# Altium PCB Zotino.PCBDOC (part 9 of 10)
Units mm, origin at the board's own origin, x right, y up, seen from the top; angles counter-clockwise.
Board outline 160.1 x 100.1 mm, 4 copper layers (TopLayer, Internal Plane 2, Signal Layer 1, BottomLayer), stack 1.563 mm thick; 759 components, 378 nets, 2272 pads, 779 vias.
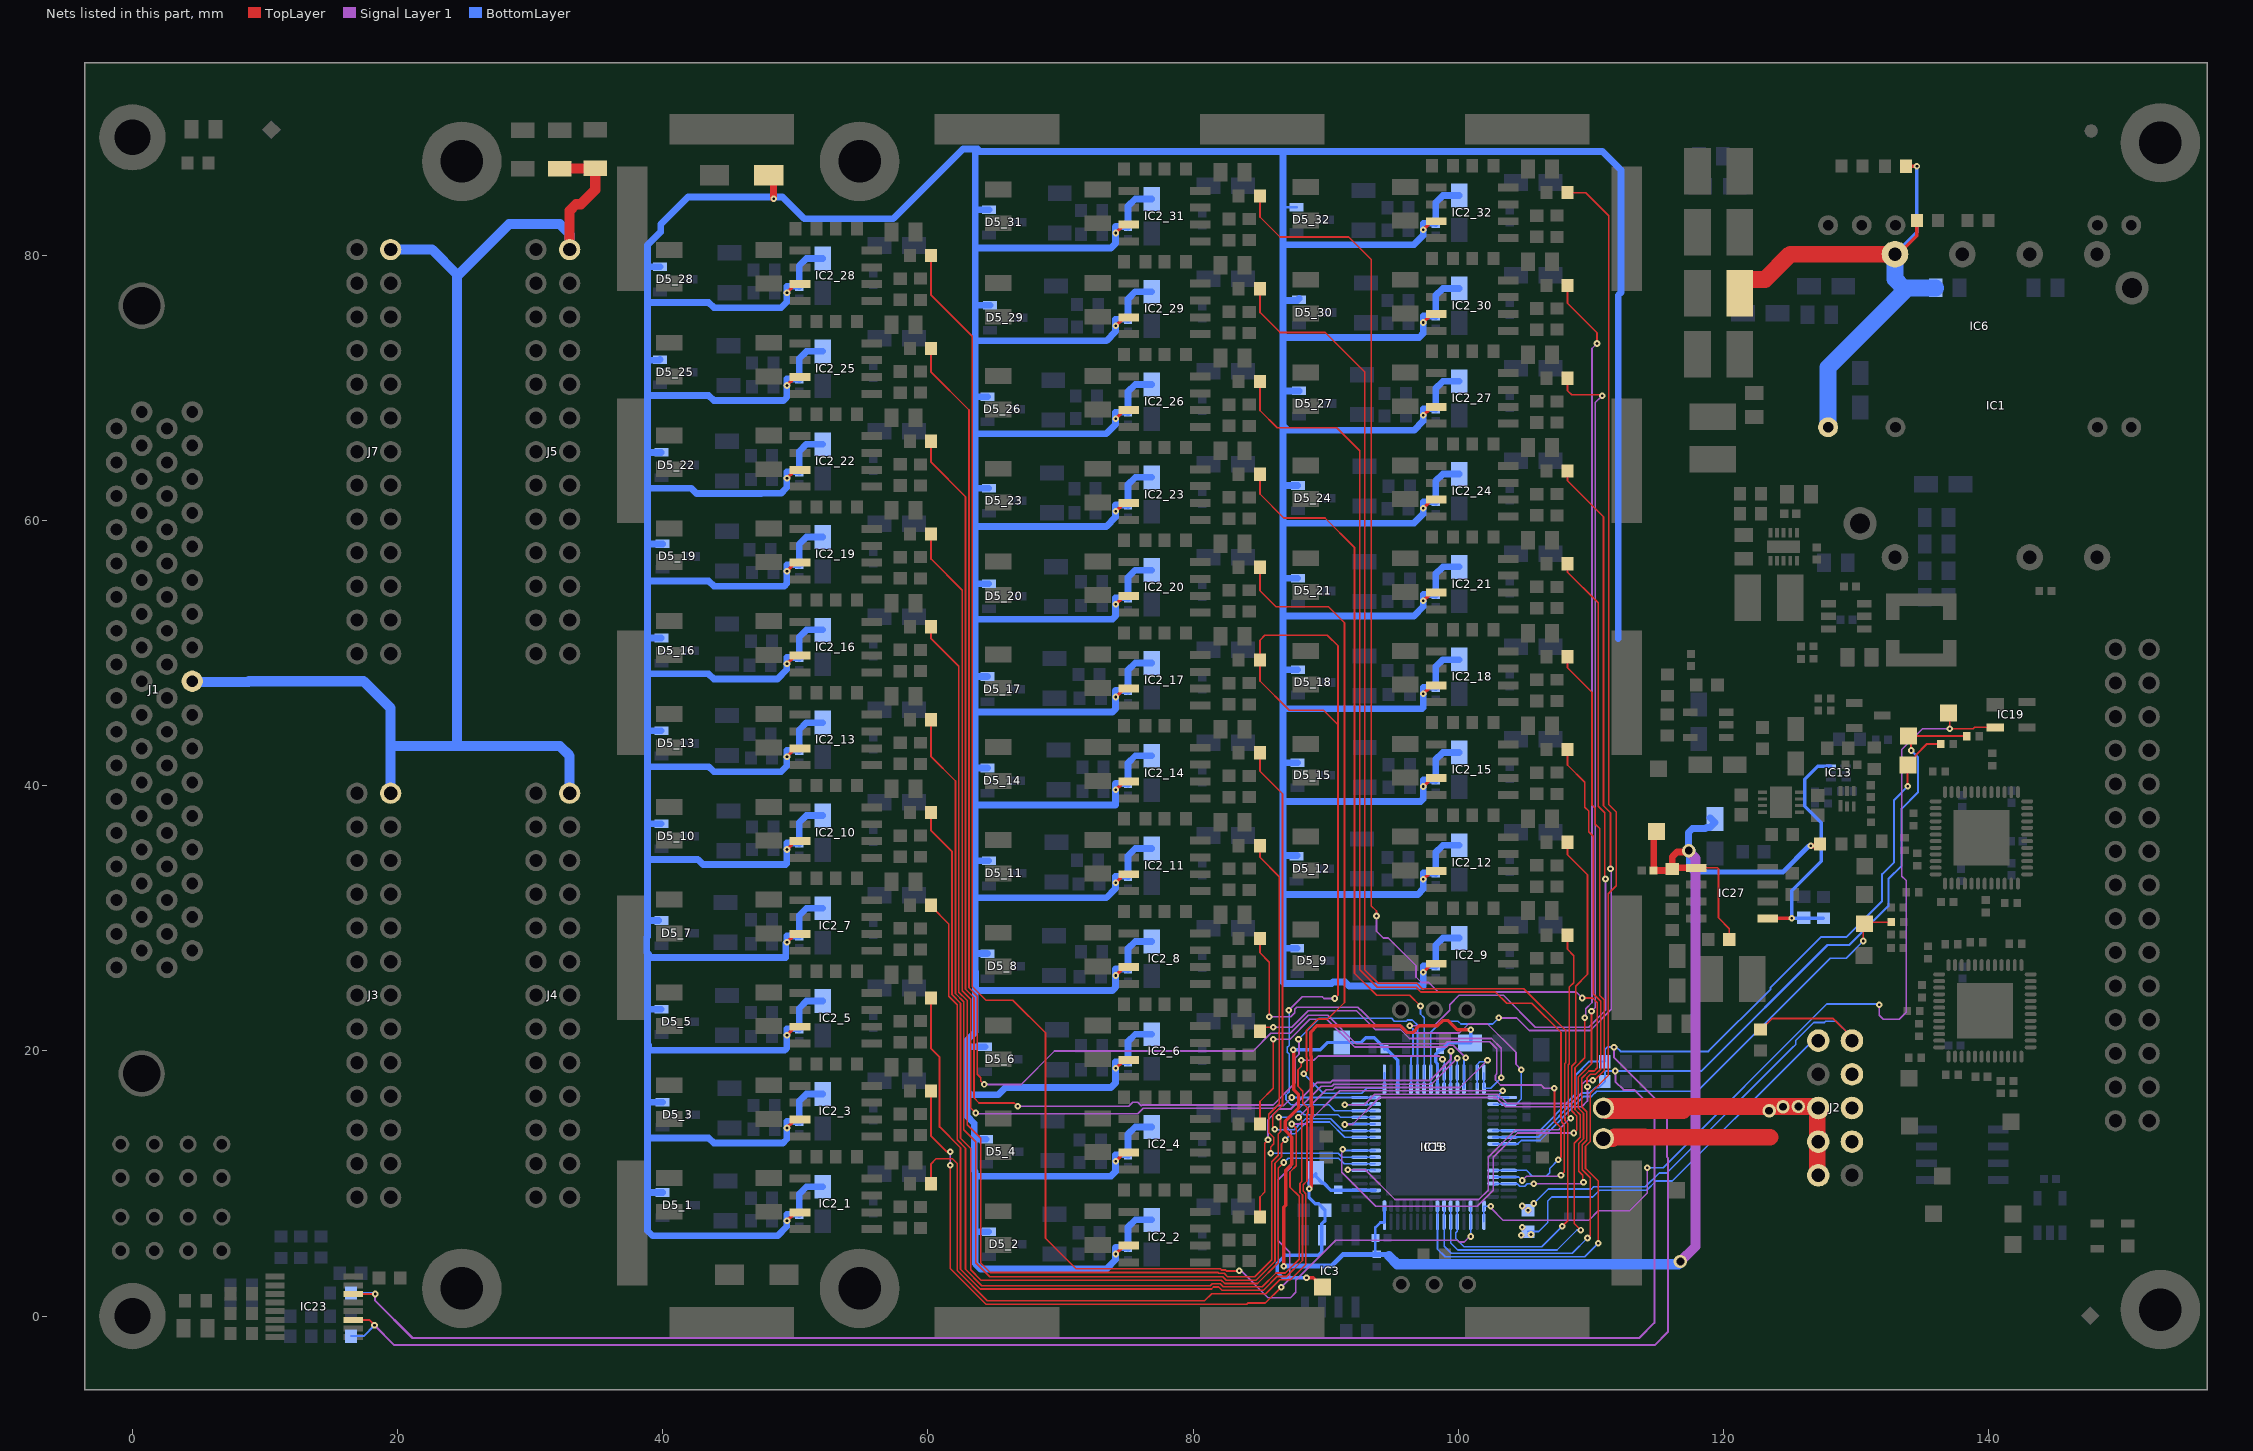
[diagram p9: the nets of this part, all layers, seen from the top]

## Via types
v1: diameter 0.5, hole 0.2, TopLayer to BottomLayer, tented both sides, 659 vias
v2: diameter 0.6, hole 0.3, TopLayer to BottomLayer, tented both sides, 56 vias
v3: diameter 1, hole 0.6, TopLayer to BottomLayer, tented both sides, 26 vias
v4: diameter 0.6, hole 0.3, TopLayer to BottomLayer, 18 vias
v5: diameter 1, hole 0.5, TopLayer to BottomLayer, tented both sides, 9 vias
v6: diameter 0.5, hole 0.2, TopLayer to BottomLayer, tented bottom, 7 vias
v7: diameter 0.5, hole 0.2, TopLayer to BottomLayer, 4 vias

## Nets (pads, with @x,y where several pads share a name; then routed paths per layer and width w, separated by ;. In a path a pad name is that pad's centre, name@x,y a point inside that pad or via, vN(x,y) a via of type N, cw(c..) or ccw(c..) an arc to the next point about the centre after c; other vN are vias at no path point) (continued)
P12V0A: C4.2 C31.2 C33.2 C47.1 C64.2 C90_1.1 C90_2.1 C90_3.1 C90_4.1 C90_5.1 C90_6.1 C90_7.1 C90_8.1 C90_9.1 C90_10.1 C90_11.1 C90_12.1 C90_13.1 C90_14.1 C90_15.1 C90_16.1 C90_17.1 C90_18.1 C90_19.1 C90_20.1 C90_21.1 C90_22.1 C90_23.1 C90_24.1 C90_25.1 C90_26.1 C90_27.1 C90_28.1 C90_29.1 C90_30.1 C90_31.1 C90_32.1 C91_1.2 C91_2.2 C91_3.2 C91_4.2 C91_5.2 C91_6.2 C91_7.2 C91_8.2 C91_9.2 C91_10.2 C91_11.2 C91_12.2 C91_13.2 C91_14.2 C91_15.2 C91_16.2 C91_17.2 C91_18.2 C91_19.2 C91_20.2 C91_21.2 C91_22.2 C91_23.2 C91_24.2 C91_25.2 C91_26.2 C91_27.2 C91_28.2 C91_29.2 C91_30.2 C91_31.2 C91_32.2 C124.1 D1.1 D5_1.2 D5_2.2 D5_3.2 D5_4.2 D5_5.2 D5_6.2 D5_7.2 D5_8.2 D5_9.2 D5_10.2 D5_11.2 D5_12.2 D5_13.2 D5_14.2 D5_15.2 D5_16.2 D5_17.2 D5_18.2 D5_19.2 D5_20.2 D5_21.2 D5_22.2 D5_23.2 D5_24.2 D5_25.2 D5_26.2 D5_27.2 D5_28.2 D5_29.2 D5_30.2 D5_31.2 D5_32.2 IC2_1.7 IC2_2.7 IC2_3.7 IC2_4.7 IC2_5.7 IC2_6.7 IC2_7.7 IC2_8.7 IC2_9.7 IC2_10.7 IC2_11.7 IC2_12.7 IC2_13.7 IC2_14.7 IC2_15.7 IC2_16.7 IC2_17.7 IC2_18.7 IC2_19.7 IC2_20.7 IC2_21.7 IC2_22.7 IC2_23.7 IC2_24.7 IC2_25.7 IC2_26.7 IC2_27.7 IC2_28.7 IC2_29.7 IC2_30.7 IC2_31.7 IC2_32.7 IC5.16 IC5.35 IC18.16 IC18.35 IC27.1 R3.1 R43.2 R150.2 TP8.1 | length 1070.1
  TopLayer w0.127: IC27.1@117.94,33.81 119.547,33.81 119.622,33.736 119.622,30.039 120.44,29.22 C64.2@120.44,28.405
  TopLayer w0.254: v1(49.367,7.188) 49.875,7.696 50.224,7.696 IC2_1.7@50.351,7.823 ; v1(49.367,14.188) 49.875,14.696 50.224,14.696 IC2_3.7@50.351,14.823 ; v1(49.367,21.188) 49.875,21.696 50.224,21.696 IC2_5.7@50.351,21.823 ; v1(49.367,28.188) 49.875,28.696 50.224,28.696 IC2_7.7@50.351,28.823 ; v1(49.367,35.188) 49.875,35.696 50.224,35.696 IC2_10.7@50.351,35.823 ; v1(49.367,42.188) 49.875,42.696 50.224,42.696 IC2_13.7@50.351,42.823 ; v1(49.367,49.188) 49.875,49.696 50.224,49.696 IC2_16.7@50.351,49.823 ; v1(49.367,56.188) 49.875,56.696 50.224,56.696 IC2_19.7@50.351,56.823 ; v1(49.367,63.188) 49.875,63.696 50.224,63.696 IC2_22.7@50.351,63.823 ; v1(49.367,70.188) 49.875,70.696 50.224,70.696 IC2_25.7@50.351,70.823 ; v1(49.367,77.188) 49.875,77.696 50.224,77.696 IC2_28.7@50.351,77.823 ; v1(74.167,4.688) 74.675,5.196 75.024,5.196 IC2_2.7@75.151,5.323 ; v1(74.167,11.688) 74.675,12.196 75.024,12.196 IC2_4.7@75.151,12.323 ; v1(74.167,18.688) 74.675,19.196 75.024,19.196 IC2_6.7@75.151,19.323 ; v1(74.167,25.688) 74.675,26.196 75.024,26.196 IC2_8.7@75.151,26.323 ; v1(74.167,32.688) 74.675,33.196 75.024,33.196 IC2_11.7@75.151,33.323 ; v1(74.167,39.688) 74.675,40.196 75.024,40.196 IC2_14.7@75.151,40.323 ; v1(74.167,46.688) 74.675,47.196 75.024,47.196 IC2_17.7@75.151,47.323 ; v1(74.167,53.688) 74.675,54.196 75.024,54.196 IC2_20.7@75.151,54.323 ; v1(74.167,60.688) 74.675,61.196 75.024,61.196 IC2_23.7@75.151,61.323 ; v1(74.167,67.688) 74.675,68.196 75.024,68.196 IC2_26.7@75.151,68.323 ; v1(74.167,74.688) 74.675,75.196 75.024,75.196 IC2_29.7@75.151,75.323 ; v1(74.167,81.688) 74.675,82.196 75.024,82.196 IC2_31.7@75.151,82.323 ; v1(86.84,3.766) 86.84,8.197 86.986,8.343 86.986,11.002 87.448,11.464 87.448,13.497 86.94,14.005 86.94,14.697 87.948,15.705 87.948,16.697 87.586,17.059 v1@87.586,19.984 ; v1(97.367,25.938) 97.875,26.446 98.224,26.446 IC2_9.7@98.351,26.573 ; v1(97.367,32.938) 97.875,33.446 98.224,33.446 IC2_12.7@98.351,33.573 ; v1(97.367,39.938) 97.875,40.446 98.224,40.446 IC2_15.7@98.351,40.573 ; v1(97.367,46.938) 97.875,47.446 98.224,47.446 IC2_18.7@98.351,47.573 ; v1(97.367,53.938) 97.875,54.446 98.224,54.446 IC2_21.7@98.351,54.573 ; v1(97.367,60.938) 97.875,61.446 98.224,61.446 IC2_24.7@98.351,61.573 ; v1(97.367,67.938) 97.875,68.446 98.224,68.446 IC2_27.7@98.351,68.573 ; v1(97.367,74.938) 97.875,75.446 98.224,75.446 IC2_30.7@98.351,75.573 ; v1(97.367,81.938) 97.875,82.446 98.224,82.446 IC2_32.7@98.351,82.573
  TopLayer w0.381: v1(126.583,35.466) R43.2@127.087,35.466
  TopLayer w0.508: v1(48.357,84.27) D1.1@48.357,85.944 ; TP8.1@114.944,36.54 114.728,36.323 C33.2@114.728,33.599 116.034,33.599 R150.2@116.14,33.705 ; v3(117.378,35.099) 117.284,35.005 116.494,35.005 116.14,34.652 R150.2@116.14,33.705 ; IC27.1@117.9,33.851 IC27.1@117.94,33.81 116.245,33.81 R150.2@116.14,33.705 ; R43.2@127.087,35.466 127.22,35.598 R43.2@127.283,35.598
  Signal Layer 1 w0.762: v3(116.744,4.113) 117.883,5.252 117.883,29.42 117.9,29.437 117.9,34.512 117.423,34.989 117.423,35.035 v3@117.488,35.099
  BottomLayer w0.2: 86.771,83.588 86.821,83.638 D5_32.2@87.794,83.638 ; R3.1@93.744,4.758 93.744,6.688 94.112,7.056 94.426,7.056 IC5.16@94.426,7.113 IC18.16@94.426,8.288
  BottomLayer w0.254: v1(87.544,20.088) 89.595,20.088 90.146,20.639 C47.1@91.194,20.639 92.675,20.639 93.021,20.985 93.652,20.985 94.437,20.2 C4.2@94.437,20.121 ; C4.2@94.522,20.206 95.426,19.302 IC5.35@95.426,18.363 IC18.35@95.426,17.188
  BottomLayer w0.381: v1(86.84,3.766) 90.422,3.766 91.314,4.658 R3.1@93.844,4.658 94.644,4.658 94.772,4.53 ; v3(117.378,35.099) 117.378,33.813 117.706,33.485 124.468,33.485 126.449,35.466 v1(126.583,35.466)
  BottomLayer w0.508: 38.907,58.238 D5_19.2@39.994,58.238 ; D5_7.2@39.694,29.833 38.911,29.833 38.857,29.888 ; D5_25.2@39.794,72.138 39.744,72.088 38.857,72.088 ; D5_28.2@39.794,79.138 38.907,79.138 38.857,79.188 ; D5_5.2@39.894,23.138 38.907,23.138 38.857,23.188 ; D5_10.2@39.894,37.138 38.907,37.138 38.857,37.088 ; D5_13.2@39.894,44.138 38.907,44.138 38.857,44.088 ; D5_16.2@39.894,51.138 38.907,51.138 38.857,51.088 ; D5_22.2@39.894,65.138 38.907,65.138 38.857,65.088 ; D5_1.2@39.994,9.319 38.925,9.319 38.857,9.388 ; D5_3.2@39.994,16.138 38.907,16.138 38.857,16.188 ; C91_1.2@50.292,7.638 C91_1.2@50.292,7.675 ; C91_3.2@50.292,14.638 C91_3.2@50.292,14.675 ; C91_5.2@50.292,21.638 C91_5.2@50.292,21.675 ; C91_7.2@50.292,28.638 C91_7.2@50.292,28.675 ; C91_10.2@50.292,35.638 C91_10.2@50.292,35.675 ; C91_13.2@50.292,42.638 C91_13.2@50.292,42.675 ; C91_16.2@50.292,49.638 C91_16.2@50.292,49.675 ; C91_19.2@50.292,56.638 C91_19.2@50.292,56.675 ; C91_22.2@50.292,63.638 C91_22.2@50.292,63.675 ; C91_25.2@50.292,70.638 C91_25.2@50.292,70.675 ; C91_28.2@50.292,77.638 C91_28.2@50.292,77.675 ; C90_1.1@52.07,9.758 50.83,9.758 50.292,9.22 C91_1.2@50.292,7.675 ; C90_3.1@52.07,16.758 50.83,16.758 50.292,16.22 C91_3.2@50.292,14.675 ; C90_5.1@52.07,23.758 50.83,23.758 50.292,23.22 C91_5.2@50.292,21.675 ; C90_7.1@52.07,30.758 50.83,30.758 50.292,30.22 C91_7.2@50.292,28.675 ; C90_10.1@52.07,37.758 50.83,37.758 50.292,37.22 C91_10.2@50.292,35.675 ; C90_13.1@52.07,44.758 50.83,44.758 50.292,44.22 C91_13.2@50.292,42.675 ; C90_16.1@52.07,51.758 50.83,51.758 50.292,51.22 C91_16.2@50.292,49.675 ; C90_19.1@52.07,58.758 50.83,58.758 50.292,58.22 C91_19.2@50.292,56.675 ; C90_22.1@52.07,65.758 50.83,65.758 50.292,65.22 C91_22.2@50.292,63.675 ; C90_25.1@52.07,72.758 50.83,72.758 50.292,72.22 C91_25.2@50.292,70.675 ; C90_28.1@52.07,79.758 50.83,79.758 50.292,79.22 C91_28.2@50.292,77.675 ; 63.621,34.338 D5_11.2@64.594,34.338 ; 63.726,24.553 73.909,24.553 74.15,24.794 74.15,26.175 C91_8.2@75.092,26.175 ; D5_6.2@64.31,20.319 62.993,20.319 62.963,20.288 ; D5_4.2@64.394,13.338 63.538,13.338 63.488,13.388 ; D5_17.2@64.494,48.238 63.621,48.238 63.571,48.288 ; D5_26.2@64.494,69.338 63.621,69.338 63.571,69.388 ; D5_8.2@64.499,27.338 63.621,27.338 63.571,27.288 ; D5_14.2@64.499,41.338 63.621,41.338 63.571,41.388 ; D5_2.2@64.594,6.369 63.652,6.369 63.571,6.288 ; D5_20.2@64.594,55.238 63.621,55.238 63.571,55.288 ; D5_23.2@64.594,62.438 63.59,62.438 63.571,62.457 ; D5_31.2@64.599,83.438 63.59,83.438 63.571,83.457 ; D5_29.2@64.694,76.238 63.621,76.238 63.571,76.288 ; C91_2.2@75.092,5.138 C91_2.2@75.092,5.175 ; C91_4.2@75.092,12.138 C91_4.2@75.092,12.175 ; C91_6.2@75.092,19.138 C91_6.2@75.092,19.175 ; C91_8.2@75.092,26.138 C91_8.2@75.092,26.175 ; C91_11.2@75.092,33.138 C91_11.2@75.092,33.175 ; C91_14.2@75.092,40.138 C91_14.2@75.092,40.175 ; C91_17.2@75.092,47.138 C91_17.2@75.092,47.175 ; C91_20.2@75.092,54.138 C91_20.2@75.092,54.175 ; C91_23.2@75.092,61.138 C91_23.2@75.092,61.175 ; C91_26.2@75.092,68.138 C91_26.2@75.092,68.175 ; C91_29.2@75.092,75.138 C91_29.2@75.092,75.175 ; C91_31.2@75.092,82.138 C91_31.2@75.092,82.175 ; C90_2.1@76.87,7.258 75.63,7.258 75.092,6.72 C91_2.2@75.092,5.175 ; C90_4.1@76.87,14.258 75.63,14.258 75.092,13.72 C91_4.2@75.092,12.175 ; C90_6.1@76.87,21.258 75.63,21.258 75.092,20.72 C91_6.2@75.092,19.175 ; C90_8.1@76.87,28.258 75.63,28.258 75.092,27.72 C91_8.2@75.092,26.175 ; C90_11.1@76.87,35.258 75.63,35.258 75.092,34.72 C91_11.2@75.092,33.175 ; C90_14.1@76.87,42.258 75.63,42.258 75.092,41.72 C91_14.2@75.092,40.175 ; C90_17.1@76.87,49.258 75.63,49.258 75.092,48.72 C91_17.2@75.092,47.175 ; C90_20.1@76.87,56.258 75.63,56.258 75.092,55.72 C91_20.2@75.092,54.175 ; C90_23.1@76.87,63.258 75.63,63.258 75.092,62.72 C91_23.2@75.092,61.175 ; C90_26.1@76.87,70.258 75.63,70.258 75.092,69.72 C91_26.2@75.092,68.175 ; C90_29.1@76.87,77.258 75.63,77.258 75.092,76.72 C91_29.2@75.092,75.175 ; C90_31.1@76.87,84.258 75.63,84.258 75.092,83.72 C91_31.2@75.092,82.175 ; D5_9.2@87.849,27.738 86.821,27.738 86.771,27.688 ; D5_12.2@87.849,34.738 86.821,34.738 86.771,34.688 ; D5_15.2@87.875,41.738 86.821,41.738 86.771,41.788 ; D5_18.2@87.894,48.738 86.821,48.738 86.771,48.688 ; D5_21.2@87.894,55.638 86.821,55.638 86.771,55.688 ; D5_24.2@87.894,62.638 86.821,62.638 86.771,62.588 ; D5_27.2@87.994,69.774 86.857,69.774 86.771,69.688 ; D5_30.2@87.994,76.738 87.844,76.588 86.971,76.588 86.771,76.788 ; C91_9.2@98.292,26.388 C91_9.2@98.292,26.425 ; C91_12.2@98.292,33.388 C91_12.2@98.292,33.425 ; C91_15.2@98.292,40.388 C91_15.2@98.292,40.425 ; C91_18.2@98.292,47.388 C91_18.2@98.292,47.425 ; C91_21.2@98.292,54.388 C91_21.2@98.292,54.425 ; C91_24.2@98.292,61.388 C91_24.2@98.292,61.425 ; C91_27.2@98.292,68.388 C91_27.2@98.292,68.425 ; C91_30.2@98.292,75.388 C91_30.2@98.292,75.425 ; C91_32.2@98.292,82.388 C91_32.2@98.292,82.425 ; C90_9.1@100.07,28.508 98.83,28.508 98.292,27.97 C91_9.2@98.292,26.425 ; C90_12.1@100.07,35.508 98.83,35.508 98.292,34.97 C91_12.2@98.292,33.425 ; C90_15.1@100.07,42.508 98.83,42.508 98.292,41.97 C91_15.2@98.292,40.425 ; C90_18.1@100.07,49.508 98.83,49.508 98.292,48.97 C91_18.2@98.292,47.425 ; C90_21.1@100.07,56.508 98.83,56.508 98.292,55.97 C91_21.2@98.292,54.425 ; C90_24.1@100.07,63.508 98.83,63.508 98.292,62.97 C91_24.2@98.292,61.425 ; C90_27.1@100.07,70.508 98.83,70.508 98.292,69.97 C91_27.2@98.292,68.425 ; C90_30.1@100.07,77.508 98.83,77.508 98.292,76.97 C91_30.2@98.292,75.425 ; C90_32.1@100.07,84.508 98.83,84.508 98.292,83.97 C91_32.2@98.292,82.425 ; 112.063,51.081 112.063,77 112.268,77.205 112.268,86.436 110.864,87.84 86.771,87.84 ; v3(117.378,35.099) 117.351,35.126 117.351,36.48 117.648,36.777 118.639,36.777 118.71,36.848 118.985,36.848 119.356,37.219 C124.1@118.985,37.59 ; 38.857,9.388 38.857,13.439 ; 38.857,9.388 38.857,6.439 39.242,6.053 48.652,6.053 49.35,6.751 49.35,7.675 C91_1.2@50.292,7.675 ; 38.857,13.439 38.857,16.188 ; 38.857,13.439 43.463,13.439 43.849,13.053 49.066,13.053 49.35,13.338 49.35,14.675 C91_3.2@50.292,14.675 ; 38.857,16.188 38.857,20.439 ; 38.857,20.439 38.857,23.188 ; 38.857,20.439 38.922,20.439 38.922,20.053 49.209,20.053 49.35,20.194 49.35,21.675 C91_5.2@50.292,21.675 ; 38.857,23.188 38.857,27.382 ; 38.857,27.382 38.922,27.317 38.922,27.053 49.266,27.053 49.266,28.104 49.35,28.188 49.35,28.675 C91_7.2@50.292,28.675 ; 38.857,27.382 38.788,27.45 38.788,28.55 38.857,28.618 38.857,29.888 ; 38.857,29.888 38.857,34.439 ; 38.857,34.439 42.644,34.439 43.03,34.053 49.266,34.053 49.35,34.138 49.35,35.675 C91_10.2@50.292,35.675 ; 38.857,34.439 38.857,37.088 ; 38.857,37.088 38.857,41.439 ; 38.857,41.439 38.857,44.088 ; 38.857,41.439 43.463,41.439 43.849,41.053 48.909,41.053 49.35,41.494 49.35,42.675 C91_13.2@50.292,42.675 ; 38.857,44.088 38.857,48.439 ; 38.857,48.439 38.857,51.088 ; 38.857,48.439 43.463,48.439 43.849,48.053 48.652,48.053 49.35,48.751 49.35,49.675 C91_16.2@50.292,49.675 ; 38.857,51.088 38.857,55.439 ; 38.857,55.439 38.857,62.439 ; 38.857,55.439 43.463,55.439 43.849,55.053 49.166,55.053 49.35,55.238 49.35,56.675 C91_19.2@50.292,56.675 ; 38.857,62.439 42.144,62.439 42.551,62.032 47.423,62.032 47.444,62.053 48.909,62.053 49.35,62.494 49.35,63.675 C91_22.2@50.292,63.675 ; 38.857,62.439 38.857,65.088 ; 38.857,65.088 38.857,69.439 ; 38.857,69.439 38.857,72.088 ; 38.857,69.439 43.463,69.439 43.849,69.053 49.109,69.053 49.35,69.294 49.35,70.675 C91_25.2@50.292,70.675 ; 38.857,72.088 38.857,76.439 ; 38.857,76.439 38.857,79.188 ; 38.857,76.439 43.463,76.439 43.849,76.053 48.934,76.053 49.35,76.469 49.35,77.675 C91_28.2@50.292,77.675 ; 38.857,79.188 38.857,80.775 39.839,81.758 39.839,82.333 41.91,84.404 49.022,84.404 50.662,82.764 57.388,82.764 62.648,88.024 63.754,88.024 63.571,87.84 ; 62.963,16.97 62.963,20.288 ; 62.963,16.97 62.963,15.579 62.967,15.575 62.967,15.052 63.488,14.531 63.488,13.388 ; 62.963,16.97 63.244,16.688 65.293,16.688 65.844,17.239 73.811,17.239 74.15,17.578 74.15,19.175 C91_6.2@75.092,19.175 ; 62.963,20.288 62.963,20.831 63.571,21.439 63.571,24.939 63.609,24.939 63.593,24.955 63.593,25.966 63.571,25.988 63.571,27.288 ; 63.488,13.388 63.488,10.955 63.571,10.873 63.571,10.488 ; 63.571,6.288 63.571,10.488 ; 63.571,6.288 63.571,3.939 63.956,3.553 73.452,3.553 74.15,4.251 74.15,5.175 C91_2.2@75.092,5.175 ; 63.571,10.488 63.636,10.553 73.809,10.553 74.15,10.894 74.15,12.175 C91_4.2@75.092,12.175 ; 63.571,27.288 63.571,31.488 ; 63.571,31.488 63.571,38.638 ; 63.571,31.488 63.636,31.553 73.452,31.553 74.15,32.251 74.15,33.175 C91_11.2@75.092,33.175 ; 63.571,38.638 63.571,41.388 ; 63.571,38.638 63.656,38.553 74.15,38.553 74.15,40.175 C91_14.2@75.092,40.175 ; 63.571,41.388 63.571,45.618 ; 63.571,45.618 63.571,48.288 ; 63.571,45.618 63.636,45.553 73.909,45.553 74.15,45.794 74.15,47.175 C91_17.2@75.092,47.175 ; 63.571,48.288 63.571,52.488 ; 63.571,52.488 63.571,55.288 ; 63.571,52.488 63.636,52.553 73.909,52.553 74.15,52.794 74.15,54.175 C91_20.2@75.092,54.175 ; 63.571,55.288 63.571,59.588 ; 63.571,59.588 63.571,62.457 ; 63.571,59.588 63.606,59.553 73.452,59.553 74.15,60.251 74.15,61.175 C91_23.2@75.092,61.175 ; 63.571,62.457 63.571,66.488 ; 63.571,66.488 63.571,69.388 ; 63.571,66.488 63.636,66.553 73.452,66.553 74.15,67.251 74.15,68.175 C91_26.2@75.092,68.175 ; 63.571,69.388 63.571,73.488 ; 63.571,73.488 63.571,76.288 ; 63.571,73.488 63.636,73.553 73.452,73.553 74.15,74.251 74.15,75.175 C91_29.2@75.092,75.175 ; 63.571,76.288 63.571,80.488 ; 63.571,80.488 63.571,83.457 ; 63.571,80.488 63.636,80.553 73.809,80.553 74.15,80.894 74.15,82.175 C91_31.2@75.092,82.175 ; 63.571,83.457 63.571,87.84 ; 63.571,87.84 86.771,87.84 ; 86.771,27.688 86.771,31.788 ; 86.771,27.688 86.771,25.189 86.868,25.091 90.446,25.091 90.544,25.189 91.463,25.189 91.758,24.894 97.35,24.894 97.35,26.425 C91_9.2@98.292,26.425 ; 86.771,31.788 86.771,34.688 ; 86.771,31.788 86.786,31.803 96.955,31.803 97.35,32.199 97.35,33.425 C91_12.2@98.292,33.425 ; 86.771,34.688 86.771,38.688 ; 86.771,38.688 86.771,41.788 ; 86.771,38.688 86.886,38.803 97.159,38.803 97.35,38.994 97.35,40.425 C91_15.2@98.292,40.425 ; 86.771,41.788 86.771,45.788 ; 86.771,45.788 86.771,48.688 ; 86.771,45.788 86.786,45.803 97.259,45.803 97.35,45.894 97.35,47.425 C91_18.2@98.292,47.425 ; 86.771,48.688 86.771,52.788 ; 86.771,52.788 86.771,55.688 ; 86.771,52.788 86.786,52.803 96.652,52.803 97.35,53.501 97.35,54.425 C91_21.2@98.292,54.425 ; 86.771,55.688 86.771,59.688 ; 86.771,59.688 86.771,62.588 ; 86.771,59.688 86.886,59.803 96.652,59.803 97.35,60.501 97.35,61.425 C91_24.2@98.292,61.425 ; 86.771,62.588 86.771,67.189 ; 86.771,67.189 86.771,69.688 ; 86.771,67.189 87.156,66.803 96.652,66.803 97.35,67.501 97.35,68.425 C91_27.2@98.292,68.425 ; 86.771,69.688 86.771,73.688 ; 86.771,73.688 86.771,76.788 ; 86.771,73.688 86.886,73.803 97.055,73.803 97.35,74.099 97.35,75.425 C91_30.2@98.292,75.425 ; 86.771,76.788 86.771,80.788 ; 86.771,80.788 86.771,83.588 86.771,87.84 ; 86.771,80.788 86.786,80.803 96.652,80.803 97.35,81.501 97.35,82.425 C91_32.2@98.292,82.425
  BottomLayer w0.762: 94.772,4.53 95.394,3.909 116.614,3.909 v3@116.744,4.038
P13V0: C130.2 IC1.7 IC6.14 L6.1 R1.2 R26.2 | length 42.6
  TopLayer w0.254: IC1.7@132.937,80.086 133.067,79.956 134.582,81.472 R1.2@134.582,82.626 ; R26.2@133.776,86.719 134.577,86.719 v1(134.586,86.729)
  TopLayer w1.27: L6.1@121.237,77.537 121.237,77.807 121.602,78.172 123.116,78.172 125.031,80.086 IC1.7@132.932,80.086
  BottomLayer w0.254: IC1.7@132.932,80.086 134.586,81.74 v1(134.586,86.729)
  BottomLayer w1.27: IC6.14@127.887,67.037 127.887,71.537 133.586,77.236 133.586,77.546 ; IC1.7@132.932,80.086 132.932,78.2 133.586,77.546 ; C130.2@136.006,77.546 133.586,77.546
P13V0_SCSI: J1.18 J3.25 J4.25 J5.25 J7.25 R30.2 R31.2 | length 101.6
  TopLayer w0.762: R31.2@32.229,86.538 34.875,86.538 R30.2@34.906,86.569 34.906,84.938 33.82,83.851 33.457,83.851 32.976,83.371 J5.25@32.976,80.434
  BottomLayer w0.762: J1.18@4.514,47.879 4.56,47.833 8.77,47.833 8.816,47.879 17.443,47.879 19.476,45.845 19.476,42.999 ; J3.25@19.476,39.434 19.476,42.999 ; J7.25@19.476,80.434 22.607,80.434 24.482,78.559 ; J4.25@32.976,39.434 32.976,42.251 32.229,42.999 24.482,42.999 ; J5.25@32.976,80.434 32.976,81.621 32.229,82.369 28.419,82.369 24.609,78.559 24.482,78.559 ; 19.476,42.999 24.482,42.999 ; 24.482,42.999 24.482,78.559
P_LDO_EN: C36.2 IC13.6 IC27.5 R39.2 | length 18.5
  TopLayer w0.254: IC27.5@123.34,30 125.131,30 125.133,30.002 v1(125.138,30.002)
  BottomLayer w0.254: R39.2@127.537,30.006 127.532,30.002 v1(125.138,30.002) 125.138,32.088 127.367,34.316 127.367,37.198 126.124,38.441 126.124,40.48 127.114,41.469 IC13.6@128.105,41.469
REF: C9.2 C12.1 C78.2 C79.1 C81.2 IC3.6 IC5.18 IC5.41 IC18.18 IC18.41 TP5.1 | length 51.1
  TopLayer w0.254: v1(88.544,2.888) 89.044,2.888 TP5.1@89.744,2.188 ; v1@88.909,9.74 88.909,15.104 88.979,15.174 88.979,15.802 88.909,15.872 88.909,19.303 88.902,19.31 88.902,19.602 88.863,19.641 88.863,21.42 89.335,21.892 95.627,21.892 96.135,21.384 96.553,21.384 97.061,21.892 98.414,21.892 98.813,22.291 99.23,22.291 99.933,21.588 v1(100.944,21.588)
  BottomLayer w0.254: v1(88.544,2.888) 86.744,2.888 86.336,3.296 86.336,3.975 86.949,4.588 89.444,4.588 89.709,4.853 IC3.6@89.709,6.088 89.709,6.953 89.944,7.188 C81.2@89.944,7.988 89.461,8.471 89.195,8.471 88.74,8.927 88.74,9.614 88.74,10.24 89.239,10.739 89.239,10.541 89.742,10.038 89.839,10.038 90.384,9.494 91.488,9.494 91.494,9.488 IC5.18@92.551,9.488 IC18.18@93.726,9.488 ; IC18.41@98.426,17.188 98.426,17.722 ; IC5.41@98.426,18.363 98.426,19.047 98.302,19.172 98.302,19.76 C9.2@98.611,20.069 98.731,20.069 99.26,20.598 C12.1@100.888,20.598 ; C12.1@100.944,20.598 v1(100.944,21.588)
  other v1: 88.749,9.614
RESETn: IC5.1 IC18.1 IC19.2 TP16.1 | length 71.8
  TopLayer w0.127: TP16.1@136.727,45.73 137.052,45.405 v1(137.052,44.288) 138.823,44.288 138.934,44.399 IC19.2@140.494,44.399
  Signal Layer 1 w0.127: v1(102.444,8.288) 102.444,8.16 103.369,7.234 109.849,7.234 110.563,7.948 112.904,7.948 114.244,9.288 v1(114.244,11.188) ; v1(131.744,23.488) 131.744,22.688 132.044,22.388 133.244,22.388 133.781,22.925 133.781,32.851 133.448,33.185 133.448,42.731 135.005,44.288 v1(137.052,44.288)
  BottomLayer w0.127: IC5.1@101.926,7.113 IC18.1@101.926,8.288 v1(102.444,8.288) ; v1(114.244,11.188) 115.444,11.188 127.791,23.535 131.697,23.535 v1(131.744,23.488)
SCKI: IC5.54 IC18.54 IC23.11 R11.1 R82.2 R117.2 TP1.1 | length 178.2
  TopLayer w0.152: IC23.11@16.657,-0.281 17.85,-0.281 v1(18.259,-0.689) ; v1(133.888,39.948) 133.888,41.536 TP1.1@133.919,41.567 134.469,42.116 134.469,42.276 135.344,43.152 R11.1@136.389,43.152
  Signal Layer 1 w0.152: v1(18.259,-0.689) 19.754,-2.184 114.807,-2.184 115.795,-1.197 115.795,11.938 115.744,11.988 115.744,15.488 111.744,19.488 v1(111.744,20.288)
  BottomLayer w0.152: R82.2@16.494,-1.512 17.435,-1.512 v1(18.259,-0.689) ; IC18.54@102.626,13.988 IC5.54@103.801,13.988 106.141,13.988 107.331,15.179 107.331,15.213 108.836,16.718 108.836,18.18 109.847,19.191 R117.2@111.044,19.191 111.044,20.088 111.244,20.288 v1(111.744,20.288) 111.918,20.288 112.247,19.959 118.856,19.959 123.547,24.65 123.547,24.791 127.344,28.588 129.244,28.588 131.961,31.305 131.961,33.326 132.866,34.232 132.866,38.926 v1(133.888,39.948)
SDI: IC5.55 IC18.55 IC23.14 R13.1 R58.2 R116.2 TP2.1 | length 178.9
  TopLayer w0.152: IC23.14@16.657,1.669 v1(18.313,1.669) ; TP2.1@134.112,43.907 TP2.1@133.944,43.738 ; v1(134.147,42.657) 134.147,43.535 TP2.1@133.944,43.738 ; R13.1@138.353,43.738 TP2.1@133.944,43.738
  Signal Layer 1 w0.152: v1(18.313,1.669) 18.313,1.161 21.126,-1.651 113.636,-1.651 114.779,-0.508 114.779,15.554 113.267,17.065 112.467,17.065 111.844,17.688 v1(111.844,18.488)
  BottomLayer w0.152: R58.2@16.494,1.738 18.245,1.738 v1(18.313,1.669) ; IC18.55@102.626,13.488 IC5.55@103.801,13.488 104.408,13.488 104.444,13.524 106.072,13.524 107.611,15.063 107.611,15.097 109.348,16.835 109.932,16.835 110.327,17.23 110.586,17.23 R116.2@111.044,17.688 111.044,18.388 111.144,18.488 v1(111.844,18.488) 118.344,18.488 127.844,27.988 129.496,27.988 132.434,30.927 132.434,32.968 133.435,33.969 133.435,38.267 134.668,39.5 134.668,42.137 v1(134.147,42.657)
SDO: IC5.56 IC18.56 R14.1 TP3.1 | length 37.7
  TopLayer w0.127: v1(130.544,28.288) 130.544,29.488 TP3.1@130.644,29.588 130.771,29.715 R14.1@132.655,29.715
  BottomLayer w0.127: 104.487,12.988 104.737,13.239 106.164,13.239 107.877,14.952 107.877,14.987 109.459,16.568 110.042,16.568 110.437,16.963 118.019,16.963 128.044,26.988 129.244,26.988 v1(130.544,28.288)
  BottomLayer w0.152: IC18.56@102.626,12.988 IC5.56@103.801,12.988 104.487,12.988
SENS1_1: J2.1 RT1.1 | length 28.8
  BottomLayer w0.127: RT1.1@105.259,6.376 106.062,6.376 106.74,7.054 106.74,8.676 107.052,8.988 110.144,8.988 110.649,9.494 114.209,9.494 114.903,10.188 116.144,10.188 125.444,19.488 126.732,20.776 J2.1@127.147,20.776
  other v1: 104.744,6.088 105.477,6.154 104.823,6.698
SENS1_2: J2.2 R15.2 RT1.2 | length 38.7
  TopLayer w0.127: R15.2@122.783,21.616 122.833,21.616 123.655,22.438 128.279,22.438 129.687,21.03 J2.2@129.687,20.776
  BottomLayer w0.127: v1(105.685,8.488) 106.785,9.588 110.044,9.588 110.204,9.748 114.103,9.748 115.144,10.788 115.726,10.788 125.134,20.196 125.152,20.196 125.444,20.488 125.444,20.788 126.805,22.149 127.61,22.149 127.7,22.238 128.479,22.238 129.687,21.03 J2.2@129.687,20.776
  other v1: 105.259,7.976 104.823,8.3
TEC1+: B5.1 J2.4 J2.6 J2.8 | length 12.6
  TopLayer w1.27: B5.1@110.944,13.388 111.644,13.388 111.756,13.5 114.063,13.5 114.075,13.488 123.514,13.488
TEC1-: B6.1 J2.5 J2.7 J2.9 | length 27.1
  TopLayer w1.27: B6.1@110.944,15.688 111.144,15.488 116.944,15.488 ; B6.1@111.154,15.798 126.929,15.798 127.031,15.696 J2.5@127.147,15.696 ; J2.5@126.977,15.546 127.065,15.458 127.065,10.699 J2.9@127.147,10.616
  other v3: 123.444,15.488 124.494,15.788 125.644,15.813
VOUT1: IC5.42 IC18.42 R24_1.1 | length 69.4
  TopLayer w0.127: R24_1.1@60.236,9.982 60.236,11.483 60.61,11.857 61.847,11.857 62.201,11.503 62.201,3.441 64.482,1.16 80.856,1.16 81.394,1.698 85.476,1.698 86.518,2.74 87.344,2.74 88.5,3.895 88.5,9.24 88.308,9.431 88.308,9.911 88.591,10.194 88.591,15.236 88.662,15.306 88.662,15.671 88.265,16.067 88.265,16.967 87.903,17.329 87.903,18.588 88.144,18.829 v1(88.144,19.288)
  Signal Layer 1 w0.127: v1(88.144,19.288) 89.103,19.288 89.431,19.616 98.571,19.616 v1(98.806,19.381)
  BottomLayer w0.127: v1(98.806,19.381) 98.926,19.26 IC5.42@98.926,18.363 IC18.42@98.926,17.188
VOUT2: IC5.43 IC18.43 R24_2.1 | length 26.7
  TopLayer w0.127: R24_2.1@85.036,7.482 85.036,8.983 85.41,9.357 85.41,12.099 85.403,12.106 85.403,13.048 v1(85.644,13.288)
  Signal Layer 1 w0.127: v1(85.644,13.288) 85.644,14.811 86.454,15.622 86.477,15.622
  Signal Layer 1 w0.152: 86.477,15.622 87.354,15.622 89.333,17.6 90.331,17.6 90.494,17.763 97.829,17.763 99.444,19.378 v1(99.444,19.988)
  BottomLayer w0.152: IC18.43@99.426,17.188 IC5.43@99.426,18.363 99.426,19.971 v1(99.444,19.988)
VOUT3: IC5.44 IC18.44 R24_3.1 | length 71.6
  TopLayer w0.127: R24_3.1@60.236,16.982 60.236,13.576 61.42,12.392 v1(61.693,12.392) ; v1(61.693,11.376) 61.693,3.59 64.376,0.906 84.044,0.906 84.126,0.988 85.444,0.988 v1(86.644,2.188)
  Signal Layer 1 w0.127: v1(61.693,11.376) v1(61.693,12.392) ; v1(86.644,2.188) 87.281,2.825 87.281,4.827 86.426,5.681 86.426,10.272 87.384,11.23 87.384,13.925 87.003,14.306 87.003,14.671 89.666,17.333 90.441,17.333 90.604,17.496 97.971,17.496 v1(99.926,19.452)
  BottomLayer w0.127: IC18.44@99.926,17.188 IC5.44@99.926,18.363 v1(99.926,19.452)
VOUT4: IC5.45 IC18.45 R24_4.1 | length 25.6
  TopLayer w0.127: R24_4.1@85.036,14.482 85.036,16.18 86.044,17.188 v1(86.044,20.888)
  Signal Layer 1 w0.127: v1(86.044,20.888) 87.303,20.888 88.803,22.388 90.085,22.388 92.179,20.294 99.126,20.294 99.262,20.429 99.627,20.429 v1(100.567,19.488)
  BottomLayer w0.127: IC18.45@100.426,17.188 IC5.45@100.426,18.363 100.426,19.347 v1(100.567,19.488)
VOUT5: IC5.47 IC18.47 R24_5.1 | length 78.6
  TopLayer w0.127: R24_5.1@60.236,23.982 60.236,20.155 60.877,19.514 60.877,14.268 62.455,12.69 62.455,3.546 63.955,2.046 81.383,2.046 81.534,2.196 81.928,2.196 82.173,1.952 85.307,1.952 86.349,2.994 87.05,2.994 88.246,4.19 88.246,9.135 88.054,9.326 88.054,10.016 88.184,10.146 88.184,14.748 v1(87.944,14.988)
  Signal Layer 1 w0.127: v1(87.944,14.988) 90.035,17.079 90.547,17.079 90.709,17.242 100.129,17.242 v1(102.194,19.308)
  BottomLayer w0.127: IC18.47@101.426,17.188 IC5.47@101.426,18.363 101.426,18.979 101.626,19.179 102.065,19.179 v1(102.194,19.308)
VOUT6: IC5.48 IC18.48 R24_6.1 | length 25.1
  TopLayer w0.127: R24_6.1@85.036,21.482 85.342,21.788 v1(86.044,21.788)
  Signal Layer 1 w0.127: v1(86.044,21.788) 87.43,21.788 88.676,23.034 92.316,23.034 93.741,21.609 95.64,21.609 96.313,20.937 102.503,20.937 103.244,20.196 v1(103.244,17.988)
  BottomLayer w0.127: IC5.48@101.926,18.363 IC18.48@101.926,17.188 102.444,17.188 v1(103.244,17.988)
VOUT7: IC5.49 IC18.49 R24_7.1 | length 84.8
  TopLayer w0.127: R24_7.1@60.236,30.982 60.236,30.899 61.566,29.57 61.566,24.121 62.201,23.486 62.201,13.303 62.836,12.668 62.836,3.524 64.06,2.3 81.278,2.3 81.428,2.45 82.034,2.45 82.278,2.206 85.202,2.206 86.244,3.248 86.944,3.248 87.992,4.295 87.992,9.03 87.303,9.718 87.303,10.871 87.765,11.333 87.765,14.166 v1(87.444,14.488)
  Signal Layer 1 w0.127: v1(87.444,14.488) 88.552,14.488 91.052,16.988 v1(103.344,16.988)
  BottomLayer w0.127: IC18.49@102.626,16.488 IC18.49@102.844,16.488 ; v1(103.344,16.988) IC18.49@102.844,16.488 ; IC5.49@103.801,16.488 IC18.49@102.844,16.488
VOUT8: IC5.50 IC18.50 R24_8.1 | length 33.2
  TopLayer w0.127: R24_8.1@85.036,28.482 85.036,27.396 85.744,26.688 v1(85.744,22.588)
  Signal Layer 1 w0.127: v1(85.744,22.588) 87.37,22.588 87.66,22.878 87.66,23.142 87.807,23.288 92.421,23.288 92.613,23.096 92.636,23.096 93.869,21.863 95.746,21.863 96.263,21.346 100.079,21.346 100.762,22.029 102.204,22.029 104.344,19.888 104.344,18.988 v1(104.744,18.588)
  BottomLayer w0.127: IC18.50@102.626,15.988 104.359,15.988 104.744,16.373 v1(104.744,18.588)
VOUT9: IC5.21 IC18.21 R24_9.1 | length 38.1
  TopLayer w0.127: R24_9.1@108.236,28.732 108.236,27.658 108.706,27.188 108.706,25.15 108.375,24.819 108.375,19.038 108.287,18.95 108.287,15.112 v1(108.49,14.909)
  Signal Layer 1 w0.127: v1(91.655,11.029) 92.98,11.029 95.221,8.788 101.544,8.788 102.244,9.488 102.244,11.988 104.315,14.059 107.572,14.059 108.423,14.909 v1(108.49,14.909)
  BottomLayer w0.127: v1(91.655,11.029) 93.686,11.029 IC18.21@93.726,10.988
VOUT10: IC5.22 IC18.22 R24_10.1 | length 74.9
  TopLayer w0.127: R24_10.1@60.236,37.982 60.236,36.596 61.82,35.013 61.82,24.226 62.455,23.591 62.455,13.408 63.217,12.646 63.217,3.502 64.004,2.715 82.128,2.715 82.383,2.46 84.85,2.46 86.426,4.036 86.426,11.171 v1(86.844,11.588)
  BottomLayer w0.127: v1@86.844,11.588 87.172,11.917 90.96,11.917 91.388,11.488 IC5.22@92.551,11.488 IC18.22@93.726,11.488
VOUT11: IC5.23 IC18.23 R24_11.1 | length 32.4
  TopLayer w0.127: R24_11.1@85.036,35.482 85.036,34.596 86.485,33.148 86.485,21.406 86.444,21.365 86.444,21.311 86.484,21.271 86.484,16.011 85.704,15.23 85.704,13.852 86.084,13.471 86.084,12.988 85.844,12.748 v1(85.844,12.288)
  BottomLayer w0.127: v1(85.844,12.288) 90.947,12.289 91.247,11.988 IC5.23@92.551,11.988 IC18.23@93.726,11.988
VOUT12: IC5.24 IC18.24 R24_12.1 | length 49.9
  TopLayer w0.127: R24_12.1@108.236,35.732 108.236,34.796 109.744,33.288 109.744,25.788 108.844,24.888 108.844,19.147 108.541,18.845 108.541,15.481 108.931,15.092 108.931,14.033 v1(108.703,13.805)
  Signal Layer 1 w0.127: v1(91.27,12.588) 91.214,12.532 91.214,10.847 93.772,8.288 101.426,8.288 102.626,9.488 102.626,11.971 104.461,13.805 v1(108.703,13.805)
  BottomLayer w0.127: v1(91.27,12.588) 91.37,12.488 IC5.24@92.551,12.488 IC18.24@93.726,12.488
VOUT13: IC5.26 IC18.26 R24_13.1 | length 83.3
  TopLayer w0.127: R24_13.1@60.236,44.982 60.236,42.196 62.074,40.359 62.074,24.331 62.709,23.696 62.709,14.043 63.598,13.154 63.598,4.032 64.661,2.969 82.234,2.969 82.489,2.714 84.745,2.714 86.172,4.141 86.172,11.54 86.661,12.029 86.661,13.006 v1(86.944,13.288)
  BottomLayer w0.127: v1(86.944,13.288) 87.4,13.744 87.682,13.744 88.573,14.635 90.281,14.635 91.428,13.488 IC5.26@92.551,13.488 IC18.26@93.726,13.488
VOUT14: IC5.27 IC18.27 R24_14.1 | length 37.8
  TopLayer w0.127: R24_14.1@85.036,42.482 85.036,41.096 86.739,39.394 86.739,15.906 86.003,15.171 86.003,14.229 v1(86.144,14.088)
  BottomLayer w0.127: v1(86.144,14.088) 86.185,14.048 87.626,14.048 87.884,14.306 87.884,14.355 88.077,14.548 88.126,14.548 88.467,14.889 90.386,14.889 91.287,13.988 IC5.27@92.551,13.988 IC18.27@93.726,13.988
VOUT15: IC5.28 IC18.28 R24_15.1 | length 50.1
  TopLayer w0.127: R24_15.1@108.236,42.732 108.236,41.564 109.544,40.256 109.544,38.37 109.826,38.088 109.826,36.54 110.177,36.188 110.177,24.304 110.738,23.742 110.738,18.623 110.344,18.229 109.961,18.229 109.703,17.971 109.703,17.329 v1(109.744,17.288)
  Signal Layer 1 w0.127: v1(91.444,14.454) 92.014,14.454 94.04,16.48 102.87,16.48 103.57,15.78 109.295,15.78 109.744,16.229 v1(109.744,17.288)
  BottomLayer w0.127: v1(91.444,14.454) 91.478,14.488 IC5.28@92.551,14.488 IC18.28@93.726,14.488
VOUT16: IC5.29 IC18.29 R24_16.1 | length 91.1
  TopLayer w0.127: R24_16.1@60.236,51.982 60.236,51.096 62.328,49.005 62.328,24.437 62.963,23.802 62.963,14.424 63.979,13.408 63.979,4.01 64.695,3.294 81.871,3.294 81.942,3.223 82.339,3.223 82.594,2.968 84.64,2.968 85.918,4.246 85.918,11.645 86.407,12.134 86.407,13.729 86.585,13.906 86.585,14.847 v1(86.444,14.988)
  BottomLayer w0.127: v1(86.444,14.988) 87.321,14.988 87.761,15.429 88.126,15.429 88.378,15.177 90.927,15.177 91.116,14.988 IC5.29@92.551,14.988 IC18.29@93.726,14.988
VOUT17: IC5.30 IC18.30 R24_17.1 | length 61.4
  TopLayer w0.127: v1(90.678,23.952) 90.926,24.2 90.926,44.588 ; 90.926,44.588 89.826,45.688 87.244,45.688 85.036,47.896 R24_17.1@85.036,49.482 85.036,50.983 85.41,51.357 90.116,51.357 90.926,50.547 90.926,44.588
  Signal Layer 1 w0.127: v1(87.22,23.06) 88.24,24.08 89.738,24.08 89.866,23.952 v1(90.678,23.952)
  BottomLayer w0.127: v1(87.22,23.06) 87.244,23.036 87.244,20.411 87.104,20.271 87.104,19.906 87.244,19.765 87.244,16.911 87.003,16.671 87.003,16.306 87.38,15.929 90.245,15.929 90.685,15.488 IC5.30@92.551,15.488 IC18.30@93.726,15.488
VOUT18: IC5.31 IC18.31 R24_18.1 | length 56.3
  TopLayer w0.127: R24_18.1@108.236,49.732 108.236,48.896 110.08,47.053 110.08,38.553 110.334,38.299 110.334,37.099 110.655,36.777 110.655,24.185 110.992,23.848 110.992,18.518 110.262,17.788 v1(110.144,17.788)
  Signal Layer 1 w0.127: v1(91.444,15.938) 92.894,15.938 93.69,16.734 102.975,16.734 103.162,16.548 103.184,16.548 103.698,16.034 108.49,16.034 109.303,16.848 109.303,17.471 109.562,17.729 109.926,17.729 109.967,17.688 110.144,17.688 v1(110.144,17.788)
  BottomLayer w0.127: v1(91.444,15.938) 93.676,15.938 IC18.31@93.726,15.988
VOUT19: IC5.32 IC18.32 R24_19.1 | length 75.7
  TopLayer w0.127: R24_19.1@60.236,58.982 60.236,57.096 62.582,54.751 62.582,24.542 63.217,23.907 63.217,15.694 v1(63.598,15.313)
  Signal Layer 1 w0.127: v1(63.598,15.313) 63.655,15.256 75.813,15.256 76.229,15.672 86.145,15.672 86.362,15.888 86.844,15.888 v1(87.444,16.488)
  BottomLayer w0.127: v1(87.444,16.488) IC5.32@92.551,16.488 IC18.32@93.726,16.488
VOUT20: IC5.33 IC18.33 R24_20.1 | length 52.9
  TopLayer w0.127: R24_20.1@85.036,56.482 85.036,54.696 86.244,53.488 90.211,53.488 91.411,52.288 91.411,23.655 90.162,22.406 89.4,22.406 88.545,21.552 88.545,19.509 88.584,19.471 88.584,18.529 v1(88.344,18.288)
  BottomLayer w0.127: v1(88.344,18.288) 89.817,16.815 92.718,16.815 93.091,17.188 IC18.33@94.426,17.188 IC5.33@94.426,18.363
VOUT21: IC5.37 IC18.37 R24_21.1 | length 57.2
  TopLayer w0.127: R24_21.1@108.236,56.732 108.236,56.096 110.544,53.788 110.544,38.447 111.036,37.955 111.036,33.026 v1(111.096,32.966)
  Signal Layer 1 w0.127: v1(96.344,21.888) 98.169,21.888 99.344,23.063 99.344,23.488 100.044,24.188 103.407,24.188 105.802,21.794 109.832,21.794 111.096,23.058 v1(111.096,32.966)
  BottomLayer w0.127: v1(96.344,21.888) 96.586,21.646 96.586,19.653 96.426,19.493 IC5.37@96.426,18.363 IC18.37@96.426,17.188
VOUT22: IC5.38 IC18.38 R24_22.1 | length 94.4
  TopLayer w0.127: R24_22.1@60.236,65.982 60.236,64.396 62.836,61.797 62.836,24.647 63.471,24.012 63.471,16.456 63.852,16.075 66.519,16.075 v1(66.773,15.821)
  Signal Layer 1 w0.127: v1(66.773,15.821) 75.133,15.821 75.448,16.137 75.813,16.137 76.074,15.876 76.124,15.926 86.04,15.926 87.703,17.589 87.703,19.471 87.985,19.752 87.985,20.848 v1(87.944,20.888)
  BottomLayer w0.127: v1(87.944,20.888) 89.511,22.455 94.967,22.455 95.174,22.248 96.08,22.248 96.161,22.329 96.526,22.329 96.926,21.929 IC5.38@96.926,18.363 IC18.38@96.926,17.188
VOUT23: IC5.39 IC18.39 R24_23.1 | length 54.7
  TopLayer w0.127: R24_23.1@85.036,63.482 85.036,61.996 86.844,60.188 89.944,60.188 92.144,57.988 ; 92.173,57.988 92.173,25.854 93.839,24.188 96.344,24.188 v1(97.144,23.388)
  BottomLayer w0.127: v1(97.144,23.388) 97.144,22.788 97.426,22.506 IC5.39@97.426,18.363 IC18.39@97.426,17.188
VOUT24: IC5.40 IC18.40 R24_24.1 | length 61.5
  TopLayer w0.127: R24_24.1@108.236,63.732 108.236,62.996 110.944,60.288 110.944,38.488 111.477,37.956 v1(111.477,33.728)
  Signal Layer 1 w0.127: v1(103.044,22.488) 104.394,22.488 105.342,21.54 109.937,21.54 111.536,23.139 111.536,33.669 v1(111.477,33.728)
  BottomLayer w0.127: IC18.40@97.926,17.188 IC5.40@97.926,18.363 97.926,21.416 98.758,22.248 99.981,22.248 100.2,22.029 102.584,22.029 v1(103.044,22.488)
VOUT25: IC5.60 IC18.60 R24_25.1 | length 117.7
  TopLayer w0.127: R24_25.1@60.236,72.982 60.236,71.196 63.09,68.343 63.09,24.752 63.725,24.117 63.725,18.234 63.979,17.98 63.979,17.726 v1(64.233,17.472) ; v1(107.246,17.195) 107.246,14.694 107.742,14.198 107.742,11.986 v1(107.544,11.788)
  Signal Layer 1 w0.127: v1(64.233,17.472) 67.028,17.472 69.544,19.988 84.521,19.988 85.861,21.329 87.329,21.329 88.689,22.688 90.144,22.688 92.285,20.548 99.021,20.548 99.156,20.683 102.371,20.683 102.902,20.152 102.902,18.269 102.804,18.171 102.804,17.806 103.181,17.429 106.244,17.429 106.477,17.195 v1(107.246,17.195)
  BottomLayer w0.127: IC18.60@102.626,10.988 IC5.60@103.801,10.988 105.138,10.988 105.579,10.548 106.626,10.548 106.884,10.806 106.884,11.128 v1(107.544,11.788)
VOUT26: IC5.61 IC18.61 R24_26.1 | length 83.6
  TopLayer w0.127: R24_26.1@85.036,70.482 85.036,68.296 86.344,66.988 90.822,66.988 92.554,65.256 92.554,26.13 93.889,24.794 96.822,24.794 97.175,24.442 102.79,24.442 103.644,23.588 105.544,23.588 107.749,21.383 107.749,14.931 107.796,14.884 107.796,14.621 107.996,14.421 107.996,10.863 v1(107.744,10.611)
  Signal Layer 1 w0.127: v1(104.823,10.23) 105.141,10.548 107.692,10.548 v1@107.744,10.6
  BottomLayer w0.127: IC18.61@102.626,10.488 IC5.61@103.801,10.488 104.565,10.488 v1(104.823,10.23)
VOUT27: IC5.62 IC18.62 R24_27.1 | length 71.3
  TopLayer w0.127: R24_27.1@108.236,70.732 108.236,69.796 108.544,69.488 110.769,69.488 v1(110.842,69.415) ; v1(109.444,10.088) 109.392,10.14 109.392,10.622 109.086,10.928 109.086,13.022 109.439,13.374 109.439,15.302 109.049,15.691 109.049,18.035 110.044,19.03 v1(110.044,22.988)
  Signal Layer 1 w0.127: v1(105.685,9.988) 109.344,9.988 v1(109.444,10.088) ; v1(110.044,22.988) 110.334,23.278 110.334,68.907 v1(110.842,69.415)
  BottomLayer w0.127: IC18.62@102.626,9.988 102.726,9.888 102.826,9.988 IC5.62@103.801,9.988 104.442,9.988 104.641,9.79 105.006,9.79 105.2,9.984 105.681,9.984 v1(105.685,9.988)
VOUT28: IC5.3 IC18.3 R24_28.1 | length 117.6
  TopLayer w0.127: R24_28.1@60.236,79.982 60.236,76.996 63.344,73.889 63.344,24.857 64.379,23.822 66.398,23.822 68.859,21.361 68.859,5.873 71.17,3.563 82.047,3.563 82.133,3.477 82.444,3.477 82.513,3.408 v1(83.487,3.408)
  Signal Layer 1 w0.127: v1(83.487,3.408) 83.624,3.408 85.644,1.388 87.344,1.388 87.744,1.788 87.744,2.711 90.762,5.729 99.937,5.729 100.071,5.595 100.436,5.595 100.846,6.006 v1(100.926,6.006)
  BottomLayer w0.127: v1(100.926,6.006) IC5.3@100.926,7.113 IC18.3@100.926,8.288
VOUT29: IC5.5 IC18.5 R24_29.1 | length 100.1
  TopLayer w0.127: R24_29.1@85.036,77.482 85.036,75.696 86.544,74.188 89.944,74.188 92.935,71.198 92.935,26.108 93.951,25.092 96.884,25.092 97.28,24.696 104.936,24.696 108.098,21.534 108.098,19.12 108.033,19.055 108.033,15.005 108.05,14.989 108.05,14.727 108.25,14.526 108.25,7.194 v1(107.844,6.788)
  BottomLayer w0.127: IC18.5@99.926,8.288 IC5.5@99.926,7.113 99.926,6.402 99.813,6.288 99.813,5.853 100.424,5.242 106.298,5.242 v1(107.844,6.788)
VOUT30: IC5.6 IC18.6 R24_30.1 | length 86.9
  TopLayer w0.127: R24_30.1@108.236,77.732 108.236,76.396 110.461,74.172 v1(110.461,73.352) ; v1(109.244,6.488) 108.744,6.988 108.744,13.039 109.185,13.479 109.185,15.197 108.795,15.586 108.795,18.74 109.544,19.488 v1(109.544,22.488)
  Signal Layer 1 w0.127: v1(109.544,22.488) 109.603,22.548 109.603,23.171 110.08,23.647 110.08,72.971 v1(110.461,73.352)
  BottomLayer w0.127: IC18.6@99.426,8.288 IC5.6@99.426,7.113 99.426,5.519 99.957,4.988 107.444,4.988 108.944,6.488 v1(109.244,6.488) ; v1(109.544,22.488) v1@109.544,22.588
VOUT31: IC5.7 IC18.7 R24_31.1 | length 115.2
  TopLayer w0.127: R24_31.1@85.036,84.482 85.036,82.896 86.544,81.388 91.744,81.388 93.443,79.69 93.443,30.934 93.824,30.553 v1(93.824,30.172) ; v1(109.344,23.988) 110.134,23.988 110.484,23.637 110.484,18.729 110.238,18.483 109.856,18.483 109.303,17.93 109.303,15.796 109.693,15.407 109.693,13.269 109.34,12.916 109.34,11.033 109.944,10.429 109.944,6.088 v1(109.744,5.888)
  Signal Layer 1 w0.127: v1(93.824,30.172) 93.824,29.035 94.343,28.515 94.719,28.515 96.812,26.422 96.812,25.577 97.225,25.164 97.77,25.164 98.492,24.442 108.89,24.442 v1(109.344,23.988)
  BottomLayer w0.127: IC18.7@98.926,8.288 IC5.7@98.926,7.113 98.926,5.265 99.457,4.734 108.59,4.734 v1(109.744,5.888)
VOUT32: IC5.8 IC18.8 R24_32.1 | length 98.9
  TopLayer w0.127: R24_32.1@108.236,84.732 109.6,84.732 111.344,82.988 111.344,38.588 111.917,38.015 111.917,32.461 111.304,31.848 111.304,18.148 109.947,16.791 109.947,13.164 109.594,12.811 109.594,11.138 110.544,10.188 v1(110.544,5.488)
  BottomLayer w0.127: IC18.8@98.426,8.288 IC5.8@98.426,7.113 98.426,5.054 99,4.48 109.536,4.48 v1(110.544,5.488)
pads on no net: B2.1 B3.1 B4.1 B8.1 B9.1 B10.1 FTG1.FTG2 FTG2.FTG2 FTG3.1 FTG4.1 FTG5.1 FTG6.1 IC1.9 IC2_1.1 IC2_1.5 IC2_1.8 IC2_2.1 IC2_2.5 IC2_2.8 IC2_3.1 IC2_3.5 IC2_3.8 IC2_4.1 IC2_4.5 IC2_4.8 IC2_5.1 IC2_5.5 IC2_5.8 IC2_6.1 IC2_6.5 IC2_6.8 IC2_7.1 IC2_7.5 IC2_7.8 IC2_8.1 IC2_8.5 IC2_8.8 IC2_9.1 IC2_9.5 IC2_9.8 IC2_10.1 IC2_10.5 IC2_10.8 IC2_11.1 IC2_11.5 IC2_11.8 IC2_12.1 IC2_12.5 IC2_12.8 IC2_13.1 IC2_13.5 IC2_13.8 IC2_14.1 IC2_14.5 IC2_14.8 IC2_15.1 IC2_15.5 IC2_15.8 IC2_16.1 IC2_16.5 IC2_16.8 IC2_17.1 IC2_17.5 IC2_17.8 IC2_18.1 IC2_18.5 IC2_18.8 IC2_19.1 IC2_19.5 IC2_19.8 IC2_20.1 IC2_20.5 IC2_20.8 IC2_21.1 IC2_21.5 IC2_21.8 IC2_22.1 IC2_22.5 IC2_22.8 IC2_23.1 IC2_23.5 IC2_23.8 IC2_24.1 IC2_24.5 IC2_24.8 IC2_25.1 IC2_25.5 IC2_25.8 IC2_26.1 IC2_26.5 IC2_26.8 IC2_27.1 IC2_27.5 IC2_27.8 IC2_28.1 IC2_28.5 IC2_28.8 IC2_29.1 IC2_29.5 IC2_29.8 IC2_30.1 IC2_30.5 IC2_30.8 IC2_31.1 IC2_31.5 IC2_31.8 IC2_32.1 IC2_32.5 IC2_32.8 IC3.1 IC3.5 IC3.7 IC3.8 IC7.5 IC8.17 IC8.25 IC8.29 IC8.32 IC8.35 IC8.44 IC9.17 IC9.25 IC9.29 IC9.32 IC9.35 IC9.44 IC10.1 IC10.2 IC10.3 IC10.7 IC14.3 IC23.9 IC32.5 IC35.4 IC35.7

## Polygon pours and split planes (outlines as drawn)
no net on BottomLayer "balancing" (solid, pour order 58): -2.574,91.493 156.444,91.493 156.444,-2.488 -2.574,-2.488
P3V3 on BottomLayer "L3-No Net" (solid, remove dead copper, pour order 28): 136.444,47.488 141.444,47.488 141.444,42.758 141.714,42.488 145.143,42.488 145.143,15.488 133.444,15.488 133.444,18.488 134.444,19.488 134.444,47.488 136.444,47.488
P12V0A on BottomLayer "L3-No Net" (solid, remove dead copper, pour order 30): 117.504,36.916 123.504,36.916 123.504,50.443 113.504,50.443 112.504,51.443 112.504,88.443 61.92,88.443 56.504,83.027 53.92,83.027 52.059,84.888 39.944,84.888 39.944,82.014 63.344,82.014 63.344,9.443 64.644,9.443 64.644,86.443 69.504,86.443 86.544,86.443 86.544,24.988 88.49,24.988 88.49,86.443 103.504,86.443 103.504,44.443 119.504,44.443 116.504,44.443 116.504,45.443 119.504,45.443 119.504,41.948 117.504,39.948
N12V0A on BottomLayer "L3-No Net" (solid, remove dead copper, pour order 34): 119.438,44.888 119.438,42.388 114.938,37.888 114.938,35.388 114.938,27.403 113.438,25.903 111.512,23.976 107.438,23.976 99.185,23.976 98.197,22.988 88.038,22.988 87.438,22.388 87.438,20.388 87.438,6.543 86.422,5.527 79.783,-1.112 75.938,-1.112 63.438,-1.112 58.938,-1.112 50.009,-1.112 50.009,4.979 51.438,6.409 51.691,6.662 59.938,6.662 60.283,6.662 60.283,82.088 65.138,82.088 64.348,81.298 64.348,75.388 64.348,2.978 64.438,2.888 64.49,2.94 74.438,2.94 79.142,2.94 80.09,3.888 84.938,8.736 84.938,10.888 84.938,86.588 86.422,86.588 86.422,82.404 87.938,80.888 87.938,77.888 87.938,24.788 97.718,24.788 98.438,25.509 98.818,25.888 103.938,25.888 108.938,25.888 109.938,26.888 110.649,27.599 110.649,29.388 110.649,38.599 116.938,44.888
P12V0 on BottomLayer "BottomLayer-P12V0" (solid, remove dead copper, pour order 26): 132.939,-1.012 149.944,-1.012 152.444,1.488 152.444,1.588 152.544,1.588 155.444,4.488 156.444,5.488 156.444,73.134 133.09,73.134 127.944,67.988 127.944,64.488 128.944,63.488 145.542,63.467 151.944,55.753 151.944,18.846 147.631,14.533 147.631,6.55 137.686,6.55 132.198,12.038 128.994,12.038 128.944,11.988 129.044,2.884
NetC17_2 on BottomLayer "TopLayer-No Net" (solid, remove dead copper, pour order 49): 136.378,53.247 135.569,52.438 133.319,52.438 128.219,57.538 128.219,60.013 126.769,61.463 122.694,61.463 121.394,62.763 121.394,67.938 122.094,68.638 123.669,68.638 124.094,68.213 124.094,65.063 125.444,63.713 136.222,63.713 136.378,63.557
TEC1- on BottomLayer "TopLayer-No Net" (solid, remove dead copper, pour order 55): 128.719,9.463 122.044,9.463 121.619,9.888 121.619,14.438 124.219,17.038 128.719,17.038
N13V0_SCSI on BottomLayer "L3-No Net" (solid, remove dead copper, pour order 47): 17.944,81.488 17.944,79.488 17.444,78.988 16.944,78.488 15.944,78.488 15.944,76.988 15.944,49.488 15.444,48.988 14.944,48.488 13.944,48.488 7.944,48.488 7.944,49.988 14.444,49.988 14.444,80.488 15.444,81.488
N13V0_SCSI on BottomLayer "L3-No Net" (solid, remove dead copper, pour order 38): 31.444,80.988 31.444,79.488 30.535,79.488 29.944,78.898 29.944,76.988 29.944,46.988 30.944,45.988 30.944,44.988 30.944,44.362 30.818,44.488 27.944,44.488 27.944,78.988 28.944,79.988 30.232,81.277 31.279,81.277
P13V0_SCSI on BottomLayer "L3-No Net" (solid, remove dead copper, pour order 36): 4.444,49.187 4.912,48.719 10.444,48.719 20.138,48.719 21.407,49.988 21.407,52.988 21.407,78.025 20.444,78.988 18.444,78.988 18.444,81.488 23.444,81.488 25.139,81.488 26.639,82.988 27.139,83.488 32.444,83.488 34.656,83.488 34.906,83.238 34.944,83.201 34.944,81.742 34.944,79.488 31.774,79.488 31.774,81.267 29.444,81.267 29.444,81.236 26.944,78.736 26.444,78.236 26.444,75.988 26.444,43.988 34.444,43.988 34.444,38.595 34.337,38.488 31.944,38.488 31.944,41.988 21.444,41.988 21.444,38.504 21.372,38.431 18.444,38.431 18.444,45.027 16.944,46.527 16.944,46.716 4.716,46.716 4.444,46.988
no net on TopLayer "balancing" (solid, pour order 57): -2.553,91.523 156.439,91.523 156.439,-2.469 -2.553,-2.469
TEC1+ on TopLayer "TopLayer-No Net" (solid, remove dead copper, pour order 43): 131.544,19.188 131.544,5.388 122.091,5.388 122.091,15.696 127.865,15.696 127.865,19.029 128.624,19.788 130.944,19.788
N12V0A on TopLayer "TopLayer-No Net" (solid, remove dead copper, pour order 41): 89.052,21.863 107.302,21.863 107.302,3.613 107.237,3.678 89.052,3.678
GND on Signal Layer 1 "GND_L3" (solid, remove dead copper, pour order 53): -3.556,94.488 156.444,94.488 156.441,94.486 156.441,-5.509 -3.553,-5.509 -3.556,-5.512
GND on Internal Plane 2 (split plane): 155.984,44.585 155.946,44.494 155.981,44.494 155.979,44.471 155.979,-5.007 153.444,-5.007 153.422,-5.009 -3.096,-5.009 -3.096,94.028 114.944,94.028 114.944,53.488 122.444,45.988 137.444,45.988 137.444,46.988 122.444,46.988 115.944,53.488 115.944,94.028 155.984,94.028

## Keep-outs
TopLayer:
  lines w0.1: -2.556,2.591 -1.56,2.591 ccw(c-1.56,3.098) -1.201,2.739 cw(c-1.199,2.737) -1.199,2.74 0.534,2.74 cw(c0.534,0.514) 2.109,2.088 2.631,1.566 cw(c2.084,1.019) 2.857,1.019 ; -2.556,86.411 -1.556,86.411 -1.133,85.988 1.833,85.988 3.025,87.18 3.025,87.249 ; 2.54,-2.489 2.54,-1.898 2.857,-1.581 2.857,-0.931 ; 2.54,91.491 2.54,90.579 3.025,90.094 3.025,89.488 3.025,88.488
BottomLayer:
  lines w0.1: -2.556,2.591 -1.206,2.591 -1.018,2.778 1.419,2.778 2.857,1.34 2.857,-1.256 2.54,-1.573 2.54,-2.489 ; -2.556,86.411 -1.556,86.411 -1.133,85.988 1.764,85.988 3.025,87.249 3.025,90.094 2.54,90.579 2.54,91.491
KeepOutLayer:
  drawing of 8321 lines, arcs and shapes, not listed

## Other copper
TopLayer:
  rectangle net P12V0: 129.544,64.288 131.844,66.588
  rectangle net NetC17_2: 119.044,62.356 120.044,63.956
  rectangle net GND: 43.18,2.388 43.689,3.294
  rectangle net N12V0A: 94.526,9.03 102.444,16.574
  rectangle net TEC1-: 111.944,14.888 123.444,16.988
  rectangle net TEC1+: 111.944,12.752 123.744,14.688
  rectangle net SENS1_2: 104.512,7.488 105.912,8.863
  rectangle net SENS1_1: 102.483,5.838 105.912,7.238
  rectangle net GND: 120.978,31.199 122.311,31.824
  rectangle net GND: 122.944,41.488 123.944,42.788
  rectangle net GND: 114.944,48.988 115.744,49.288
  rectangle net GND: 12.694,-0.512 13.444,0.463
  pour cut-out: 66.969,85.674 66.969,3.563 70.444,3.563 70.444,85.674
  region net P3V3: 132.766,51.007 132.018,51.007 131.161,50.15 131.161,49.494 131.667,48.988 132.808,48.988
  region net NetC16_2: 131.013,53.035 131.42,53.442 131.536,53.731 131.784,54.032 132.259,54.507 132.766,54.507 132.766,52.507 132.763,52.504 131.008,52.504
  pour cut-out: 115.944,94.488 115.944,53.488 122.444,46.988 137.444,46.988 137.444,45.988 122.444,45.988 114.944,53.488 114.944,94.488
  pour cut-out: 92.844,3.488 94.304,3.488 94.304,3.128 94.444,2.988 92.844,2.988
  pour cut-out: 101.944,3.488 107.444,3.488 107.444,5.888 107.944,5.888 107.944,2.488 101.944,2.488
Signal Layer 1:
  rectangle net GND: 120.927,34.655 121.723,36.336
  rectangle net TEC1-: 126.732,10.548 127.767,15.798
  rectangle net TEC1-: 122.997,14.988 127.065,16.48
  rectangle net P12V0: 129.724,64.388 131.848,66.638
  rectangle net N12V0A: 94.944,9.488 101.444,15.988
  rectangle net GND: 112.707,31.988 113.444,32.488
  rectangle net GND: 46.094,72.988 46.944,73.409
  rectangle net GND: 69.606,-0.512 70.944,-0.012
  rectangle net GND: 79.444,-0.512 80.806,-0.012
  rectangle net GND: 89.69,-0.512 90.979,-0.012
  rectangle net GND: 99.444,-0.481 100.506,-0.012
  rectangle net GND: 109.606,-0.512 110.944,-0.012
  rectangle net GND: 59.444,-0.512 60.806,-0.012
  rectangle net GND: 49.944,-0.481 50.944,-0.012
  rectangle net GND: 39.444,-0.481 40.806,-0.012
  rectangle net GND: 12.206,-0.536 13.178,0.114
  rectangle net GND: 114.425,21.669 115.387,22.631
  rectangle net GND: 112.147,21.754 112.944,22.619
  rectangle net GND: 140.444,42.441 142.127,43.943
  pour cut-out: 115.944,94.488 115.944,53.488 122.444,46.988 137.444,46.988 137.444,45.988 122.444,45.988 114.944,53.488 114.944,94.488